# Altium PCB PCB2_1.pcbdoc
Units mil, origin at the board's own origin, x right, y up, seen from the top; angles counter-clockwise.
Board outline 5854.02 x 5837.28 mil, 2 copper layers (Top Layer, Bottom Layer); 43 components, 34 nets, 145 pads, 54 vias.
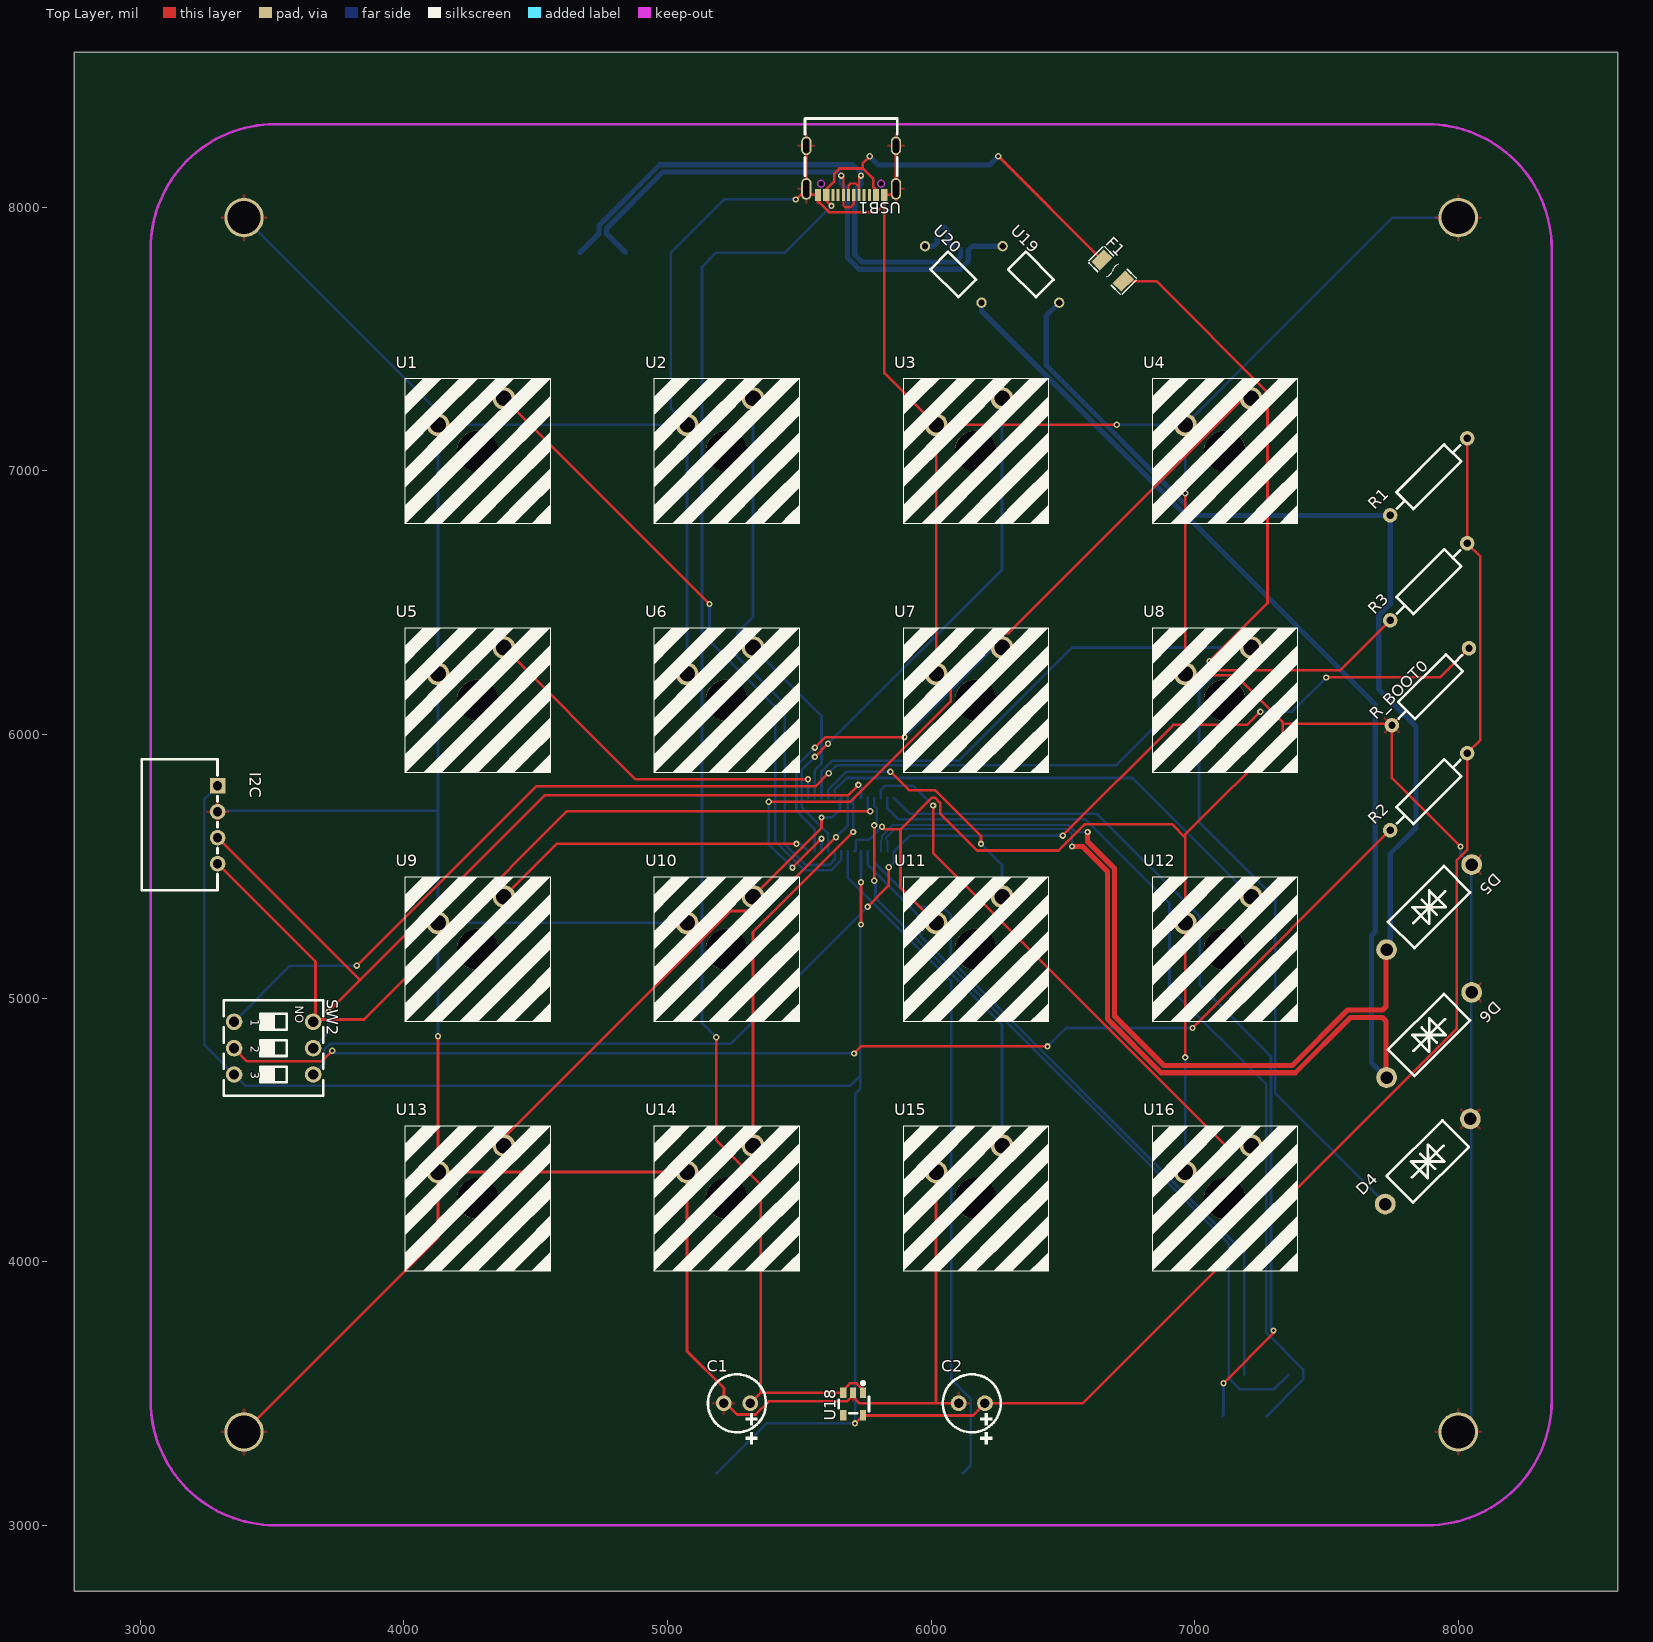
[diagram p0: Top Layer view]
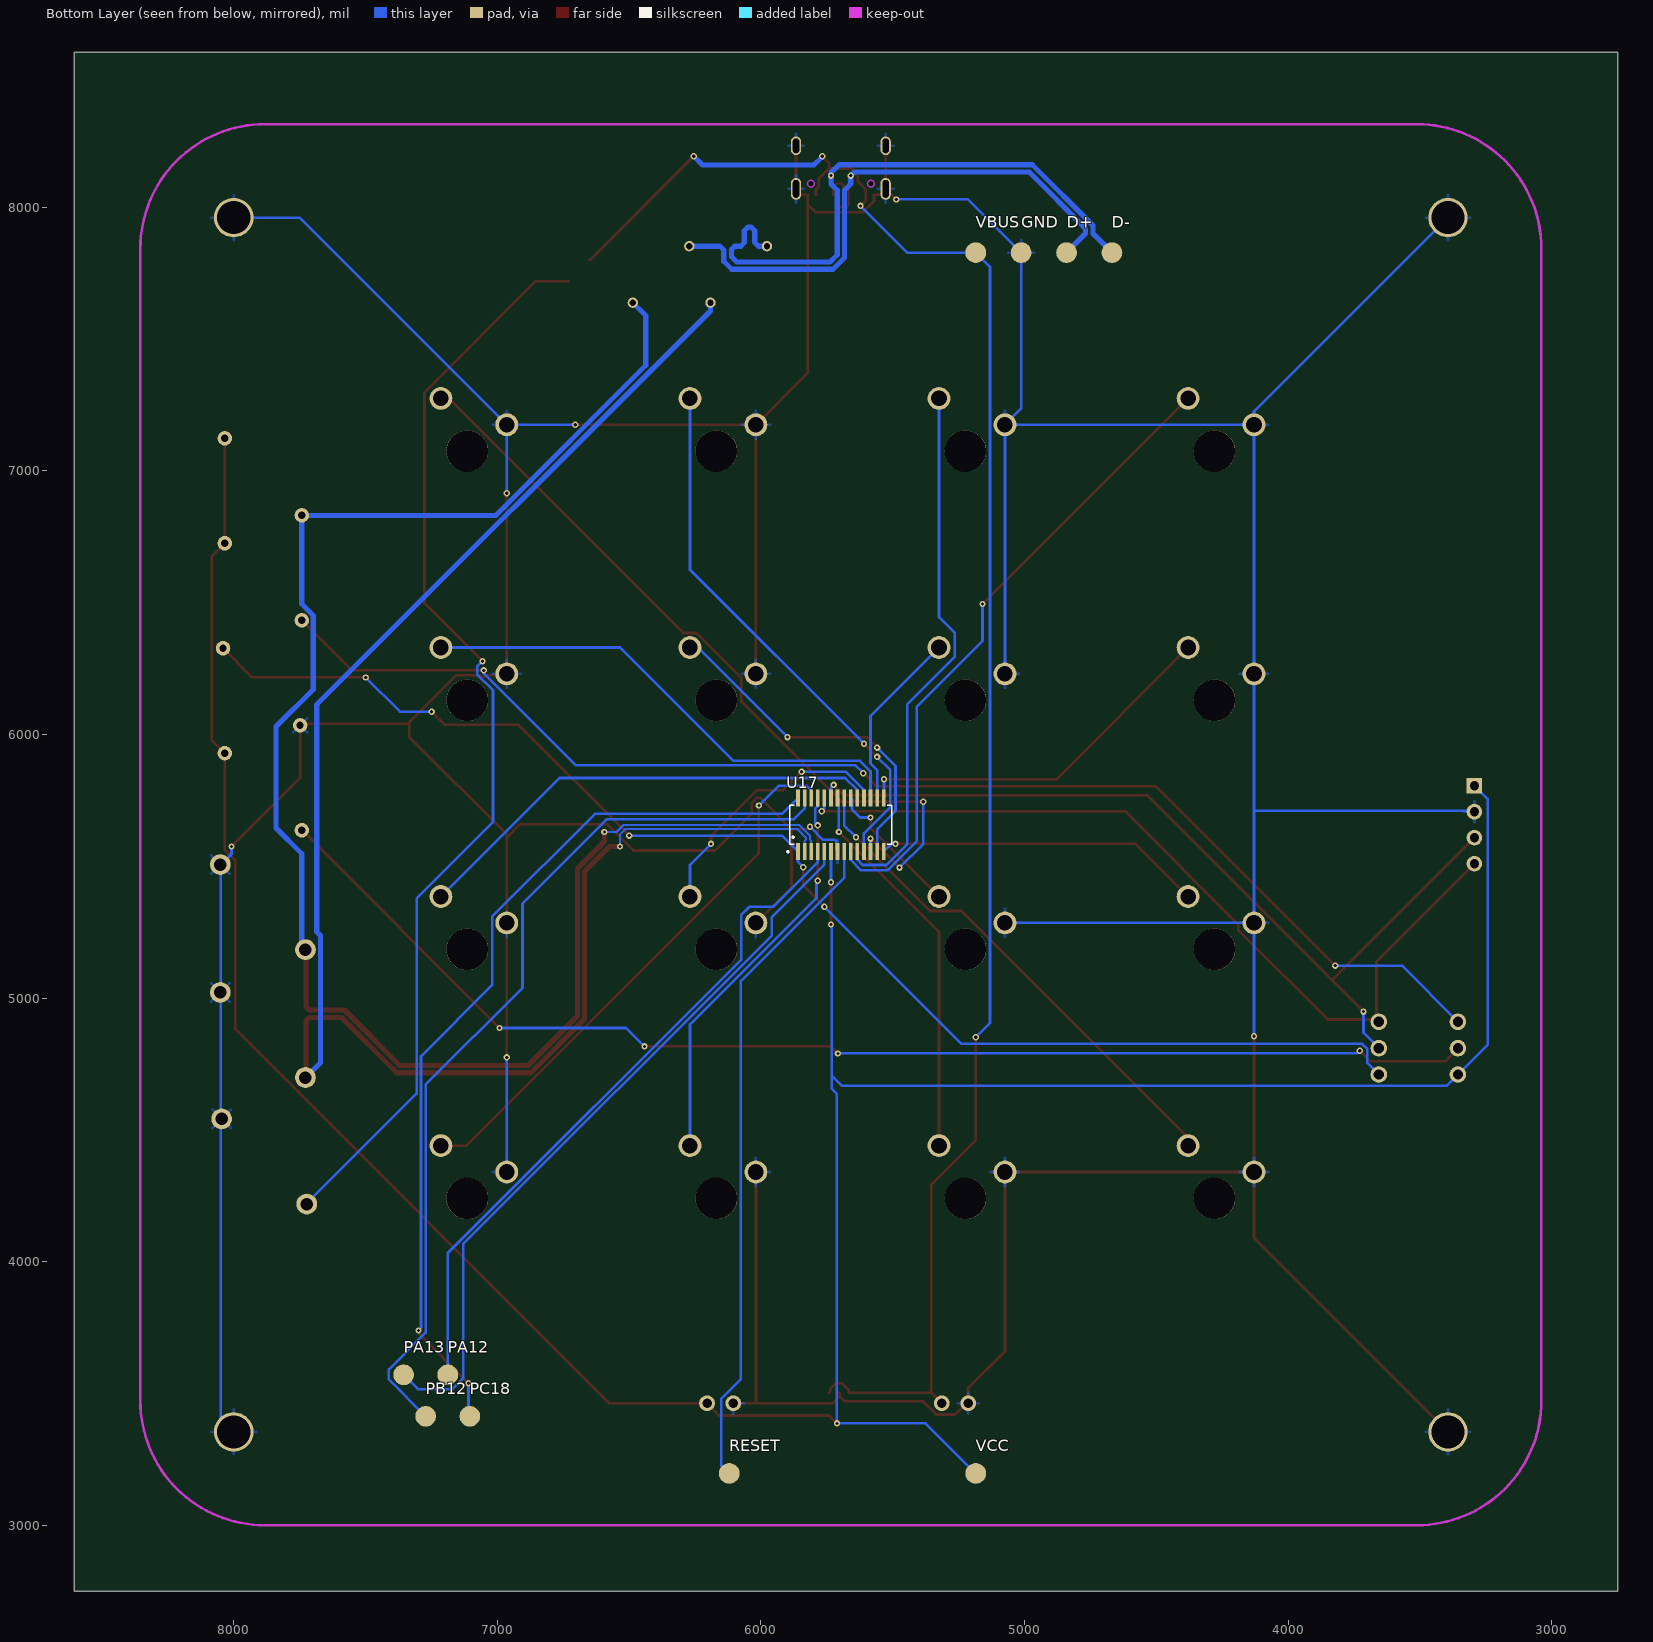
[diagram p1: Bottom Layer view, seen from below]

## Layer stack, top to bottom
Top Layer: signal copper (thickness not stored)
Dielectric: dielectric 12.6, FR-4, Dk 4.8
Bottom Layer: signal copper (thickness not stored)

## Board outline
8604.02,2750 2750,2750 2750,8587.28 8604.02,8587.28

## Design rules (kind name [scope] priority, off if disabled: settings)
BoardOutlineClearance copperThickness1oz [All] p0: genericclearance=10 ignorepadtopadclearanceinfootprint=FALSE except(0: Arc-SplitContinuation Track-SplitContinuation SMDPad-SplitContinuation THPad-SplitContinuation Via-SplitContinuation Fill-SplitContinuation Poly-SplitContinuation Region-SplitContinuation Text-SplitContinuation; 6: Track-CutoutEdge SMDPad-CutoutEdge THPad-CutoutEdge Via-CutoutEdge Region-CutoutEdge; 11.8: Track-OutlineEdge SMDPad-OutlineEdge THPad-OutlineEdge Via-OutlineEdge Fill-OutlineEdge Region-OutlineEdge Poly-OutlineEdge Text-OutlineEdge Fill-CutoutEdge)
BoardOutlineClearance copperThickness2oz [All] p0: genericclearance=10 ignorepadtopadclearanceinfootprint=FALSE except(0: Arc-SplitContinuation Track-SplitContinuation SMDPad-SplitContinuation THPad-SplitContinuation Via-SplitContinuation Fill-SplitContinuation Poly-SplitContinuation Region-SplitContinuation Text-SplitContinuation; 6: Track-CutoutEdge SMDPad-CutoutEdge THPad-CutoutEdge Via-CutoutEdge Region-CutoutEdge; 11.8: Track-OutlineEdge SMDPad-OutlineEdge THPad-OutlineEdge Via-OutlineEdge Fill-OutlineEdge Region-OutlineEdge Poly-OutlineEdge Text-OutlineEdge Fill-CutoutEdge)
Clearance copperThickness1oz [(InNet('USB_D-') OR InNet('GND') OR InNet('VCC') OR InNet('SDA') OR InNet('SCL') OR InNet('B') OR InNet('C') OR InNet('D') OR InNet('E') OR InNet('F') OR InNet('G') OR InNet('H') OR InNet('I') OR InNet('J') OR InNet('K') OR InNet('L') OR InNet('M') OR InNet('N') OR InNet('O') OR InNet('P') OR InNet('A') OR InNet('PA12') OR InNet('PA13') OR InNet('PB12') OR InNet('RESET') OR InNet('USB_D+') OR InNet('VBUS') OR InNet('$1N1970') OR InNet('PC18') OR InNet('BOOT0') OR InNet('MCU_D+') OR InNet('MCU_D-') OR InNet('$1N9766') OR InNet('$1N9709'))] p1: gap=7 ignorepadtopadclearanceinfootprint=FALSE except(4: Track-Track; 6: Track-SMDPad SMDPad-SMDPad Track-THPad SMDPad-THPad THPad-THPad Track-Via SMDPad-Via THPad-Via Via-Via SMDPad-Fill THPad-Fill Via-Fill Fill-Fill Track-Region SMDPad-Region THPad-Region Via-Region Region-Region Track-Poly SMDPad-Poly THPad-Poly Via-Poly Fill-Poly Region-Poly Poly-Poly Track-Text SMDPad-Text THPad-Text Via-Text Fill-Text Region-Text Poly-Text Text-Text; 6.9: Track-Hole SMDPad-Hole THPad-Hole Via-Hole Fill-Hole Region-Hole Poly-Hole Text-Hole Sheet-Hole; 11.8: Track-Fill Fill-Region Track-Sheet SMDPad-Sheet THPad-Sheet Via-Sheet Fill-Sheet Region-Sheet Poly-Sheet Text-Sheet)
Clearance copperThickness2oz [All] p1: gap=7 ignorepadtopadclearanceinfootprint=FALSE except(6: Track-SMDPad SMDPad-SMDPad Track-THPad SMDPad-THPad THPad-THPad Track-Via SMDPad-Via THPad-Via Via-Via SMDPad-Fill THPad-Fill Via-Fill Fill-Fill Track-Region SMDPad-Region THPad-Region Via-Region Region-Region Track-Poly SMDPad-Poly THPad-Poly Via-Poly Fill-Poly Region-Poly Poly-Poly Track-Text SMDPad-Text THPad-Text Via-Text Fill-Text Region-Text Poly-Text Text-Text; 6.9: Track-Hole SMDPad-Hole THPad-Hole Via-Hole Fill-Hole Region-Hole Poly-Hole Text-Hole Sheet-Hole; 8: Track-Track; 11.8: Track-Fill Fill-Region Track-Sheet SMDPad-Sheet THPad-Sheet Via-Sheet Fill-Sheet Region-Sheet Poly-Sheet Text-Sheet)
DiffPairsRouting differentialPair [All] p1: maxuncoupledlength=196.8504 minlimit=7.874 maxlimit=7.874 mostfreqgap=7.874 toplayer_minwidth=7.874 toplayer_prefwidth=19.685 toplayer_maxwidth=27.5591 bottomlayer_minwidth=7.874 bottomlayer_prefwidth=19.685 bottomlayer_maxwidth=27.5591
PasteMaskExpansion pasteMaskExpansion [All] p1: expansion=0
PlaneConnect innerPlane [All] p1: planeconnectstyle=Relief reliefexpansion=20 reliefentries=4 reliefconductorwidth=10 reliefairgap=10
PolygonConnect copperRegion [All] p1: connectstyle=Relief reliefentries=4 reliefconductorwidth=10 polygonreliefangle="90 Angle" airgapwidth=10
RoutingVias viaSize [All] p1: viastyle="Through Hole" holewidth=12.0078 minholewidth=11.811 maxholewidth=248.0314 width=24.0158 minwidth=19.685 maxwidth=393.7008
SolderMaskExpansion solderMaskExpansion [All] p1: useseparateexpansions=TRUE expansion=2 expansionbottom=2
Width copperThickness1oz [All] p1: maxlimit=100 minlimit=5 preferedwidth=10
Width copperThickness2oz [All] p1: maxlimit=100 minlimit=8 preferedwidth=10

## Components (designator, comment, footprint, x,y, rotation, side; value= is the part's Value field where it differs from the comment)
C1 "199D106X0025C1V1E3" CAP-TH_BD5.5-P2.54-D0.5-FD 5263.46,3462.6 r0 top
C2 "199D106X0025C1V1E3" CAP-TH_BD5.5-P2.54-D0.5-FD 6154.21,3462.6 r0 top
D4 "SA5.0CA_C5310909" DO-15_BD3.1-L6.7-P10.70-D0.9-BI 7884.06,4379.96 r45 top
D5 "SA5.0CA_C5310909" DO-15_BD3.1-L6.7-P10.70-D0.9-BI 7889.06,5344.96 r225 top
D6 "SA5.0CA_C5310909" DO-15_BD3.1-L6.7-P10.70-D0.9-BI 7889.06,4859.96 r225 top
D+ "Test-Point" Test-Point-0.5mm 4840.36,7827.68 r180 bottom
D- "Test-Point" Test-Point-0.5mm 4668.11,7827.68 r180 bottom
F1 "500mA/24V" F1206 6688.18,7759.96 r315 top
GND "Test-Point" Test-Point-0.5mm 5012.6,7827.68 r180 bottom
I2C "ZX-XH2.54-4PWZ" CONN-TH_4P-P2.50_ZX-XH2.54-4PWZ 3292.99,5657.48 r270 top
PA12 "Test-Point" Test-Point-0.5mm 7187.8,3570.79 r180 bottom
PA13 "Test-Point" Test-Point-0.5mm 7355.12,3570.79 r180 bottom
PB12 "Test-Point" Test-Point-0.5mm 7271.46,3413.31 r180 bottom
PC18 "Test-Point" Test-Point-0.5mm 7104.14,3413.31 r180 bottom
R1 "MF1/4W-1.5KΩ±1% T" RES-TH_BD2.3-L6.5-P10.50-D0.5 7887.48,6977.24 r45 top
R2 "MF1/4W-4.7KΩ±1% T" RES-TH_BD2.3-L6.5-P10.50-D0.5 7887.48,5782.74 r45 top
R3 "MF1/4W-4.7KΩ±1% T" RES-TH_BD2.3-L6.5-P10.50-D0.5 7887.48,6579.07 r45 top
R_BOOT0 "MF1/4W-10KΩ±1% T" RES-TH_BD2.3-L6.5-P10.50-D0.5 7894.06,6180.9 r45 top
RESET "Test-Point" Test-Point-0.5mm 6119.88,3196.77 r180 bottom
SW2 "DSWB03LHGET" SW-TH_DSWB03LHGET 3505.59,4809.96 r270 top
U1 "CherryMX" CherryMX_9.75u 4279.21,7074.79 r0 top
U2 "CherryMX" CherryMX_9.75u 5224.09,7074.79 r0 top
U3 "CherryMX" CherryMX_9.75u 6168.98,7074.79 r0 top
U4 "CherryMX" CherryMX_9.75u 7113.86,7074.79 r0 top
U5 "CherryMX" CherryMX_9.75u 4279.21,6129.9 r0 top
U6 "CherryMX" CherryMX_9.75u 5224.09,6129.9 r0 top
U7 "CherryMX" CherryMX_9.75u 6168.98,6129.9 r0 top
U8 "CherryMX" CherryMX_9.75u 7113.86,6129.9 r0 top
U9 "CherryMX" CherryMX_9.75u 4279.21,5185.02 r0 top
U10 "CherryMX" CherryMX_9.75u 5224.09,5185.02 r0 top
U11 "CherryMX" CherryMX_9.75u 6168.98,5185.02 r0 top
U12 "CherryMX" CherryMX_9.75u 7113.86,5185.02 r0 top
U13 "CherryMX" CherryMX_9.75u 4279.21,4240.14 r0 top
U14 "CherryMX" CherryMX_9.75u 5224.09,4240.14 r0 top
U15 "CherryMX" CherryMX_9.75u 6168.98,4240.14 r0 top
U16 "CherryMX" CherryMX_9.75u 7113.86,4240.14 r0 top
U17 "CH32X035G8R6_C49118551" QSOP-28_L9.9-W3.9-P0.64-LS6.0-BL 5696.54,5657.48 r180 bottom
U18 "AP2112K-3.3TRG1_C23380830" SOT-23-5_L2.9-W1.6-P0.95-LS2.8-BR 5704.06,3459.96 r90 top
U19 "CR1/8W-22Ω±5%-ST52" RES-TH_BD2.3-L3.7-P7.70-D0.4 6378.49,7744.96 r315 top
U20 "CR1/8W-22Ω±5%-ST52" RES-TH_BD2.3-L3.7-P7.70-D0.4 6084.02,7744.96 r315 top
USB1 "TYPE-C16PIN" USB-C-SMD_TYPE-C16PIN 5696.54,8139.96 r180 top
VBUS "Test-Point" Test-Point-0.5mm 5184.72,7827.76 r180 bottom
VCC "Test-Point" Test-Point-0.5mm 5184.84,3196.77 r180 bottom

## Footprints (in the part's own frame and the unit in brackets; to place one, negate y for a bottom-side part, rotate by r counter-clockwise, add the part's x,y. Pads: shape width x height; smd on the part's side, far side on the other; paste and mask are expansions set on the pad)
CAP-TH_BD5.5-P2.54-D0.5-FD [mil]
  round 60 hole 36: 1(-50,0) 2(50,0)
  silkscreen extent -110,-155 110,110
CherryMX_9.75u [mm]
  round 2.2 hole 1.5: 1(-3.81,2.54) 2(2.54,5.08)
  round 4 hole 4 unplated: ""(0,0)
  silkscreen extent -7,-7 7,7
CONN-TH_4P-P2.50_ZX-XH2.54-4PWZ [mm]
  rect 1.524x1.5 hole 0.9: 1(-3.75,0)
  round 1.5 hole 0.9: 2(-1.25,0) 3(1.25,0) 4(3.75,0)
  silkscreen extent -6.3,-7.32 6.3,0
DO-15_BD3.1-L6.7-P10.70-D0.9-BI [mm]
  round 2 hole 1.2: 1(-5.8,0) 2(5.8,0)
  silkscreen extent -3.8,-1.8 3.8,1.8
F1206 [mm]
  rect 1.19x1.728 smd: 1(-1.445,0) 2(1.445,0)
  silkscreen extent -2.27,-1.09 2.27,1.09
QSOP-28_L9.9-W3.9-P0.64-LS6.0-BL [mil]
  rect 14x64.57 smd: 1(-162.5,-101.18) 2(-137.5,-101.18) 3(-112.5,-101.18) 4(-87.5,-101.18) 5(-62.5,-101.18) 6(-37.5,-101.18) 7(-12.5,-101.18) 8(12.5,-101.18) 9(37.5,-101.18) 10(62.5,-101.18) 11(87.5,-101.18) 12(112.5,-101.18) 13(137.5,-101.18) 14(162.5,-101.18) 15(162.5,101.18) 16(137.5,101.18) 17(112.5,101.18) 18(87.5,101.18) 19(62.5,101.18) 20(37.5,101.18) 21(12.5,101.18) 22(-12.5,101.18) 23(-37.5,101.18) 24(-62.5,101.18) 25(-87.5,101.18) 26(-112.5,101.18) 27(-137.5,101.18) 28(-162.5,101.18)
  silkscreen extent -204,-106 193,75
RES-TH_BD2.3-L3.7-P7.70-D0.4 [mm]
  round 1 hole 0.6: 1(-3.85,0) 2(3.85,0)
  silkscreen extent -1.9,-1.2 1.9,1.2
RES-TH_BD2.3-L6.5-P10.50-D0.5 [mm]
  round 1.4 hole 0.7: 1(-5.25,0) 2(5.25,0)
  silkscreen extent -4.32,-1.15 4.32,1.15
SOT-23-5_L2.9-W1.6-P0.95-LS2.8-BR [mm]
  rect 1x0.6 smd: 1(1.1,-0.95) 2(1.1,0) 3(1.1,0.95) 4(-1.1,0.95) 5(-1.1,-0.95)
  silkscreen extent -0.89,-1.52 2.16,1.4
SW-TH_DSWB03LHGET [mm]
  round 1.6 hole 1: 1(-2.54,3.81) 2(0,3.81) 3(2.54,3.81) 4(-2.54,-3.81) 5(0,-3.81) 6(2.54,-3.81)
  silkscreen extent -4.6,-4.8 4.6,4.8
Test-Point-0.5mm [mm]
  round 2 smd: 1(0,0)
USB-C-SMD_TYPE-C16PIN [mm]
  oval 1x2.1 hole 0.6 slot 1.7 at 90 deg: 1(-4.32,1.787) 2(4.32,1.787)
  oval 1x1.8 hole 0.6 slot 1.4 at 90 deg: 3(-4.32,-2.362) 4(4.32,-2.362)
  rect 0.6x1.15 smd: A1B12(-3.2,2.362) A4B9(-2.4,2.362) B1A12(3.2,2.362) B4A9(2.4,2.362)
  rect 0.3x1.15 smd: A5(-1.25,2.362) A6(-0.25,2.362) A7(0.25,2.362) A8(1.25,2.362) B5(1.75,2.362) B6(0.75,2.362) B7(-0.75,2.362) B8(-1.75,2.362)
  Board Outline Layer circle w0.005: c2.89,1.288 r0.325
  Board Outline Layer circle w0.005: c-2.89,1.288 r0.325
  Board Outline Layer region: 2.565,1.288 2.597,1.429 2.687,1.542 2.818,1.605 2.962,1.605 3.093,1.542 3.183,1.429 3.215,1.288 3.215,1.288 3.183,1.147 3.093,1.034 2.962,0.971 2.818,0.971 2.687,1.034 2.597,1.147 2.565,1.288
  Board Outline Layer region: -3.215,1.288 -3.183,1.429 -3.093,1.542 -2.962,1.605 -2.818,1.605 -2.687,1.542 -2.597,1.429 -2.565,1.288 -2.565,1.288 -2.597,1.147 -2.687,1.034 -2.818,0.971 -2.962,0.971 -3.093,1.034 -3.183,1.147 -3.215,1.288
  Multi-Layer board cut-out: 2.565,1.288 2.597,1.429 2.687,1.542 2.818,1.605 2.962,1.605 3.093,1.542 3.183,1.429 3.215,1.288 3.215,1.288 3.183,1.147 3.093,1.034 2.962,0.971 2.818,0.971 2.687,1.034 2.597,1.147 2.565,1.288
  Multi-Layer board cut-out: -3.215,1.288 -3.183,1.429 -3.093,1.542 -2.962,1.605 -2.818,1.605 -2.687,1.542 -2.597,1.429 -2.565,1.288 -2.565,1.288 -2.597,1.147 -2.687,1.034 -2.818,0.971 -2.962,0.971 -3.093,1.034 -3.183,1.147 -3.215,1.288
  silkscreen extent -4.45,-5 4.45,0.52

## Free pads (board coordinates)
  round 149.61 hole 125.98: 1(3393.39,3354.33) 1(3393.39,7960.63) 1(7999.68,3354.33) 1(7999.68,7960.63)

## Via types
v1: diameter 24.02, hole 12.01, Top Layer to Bottom Layer, 54 vias

## Nets (pads, with @x,y where several pads share a name; then routed paths per layer and width w, separated by ;. In a path a pad name is that pad's centre, name@x,y a point inside that pad or via, vN(x,y) a via of type N, cw(c..) or ccw(c..) an arc to the next point about the centre after c; other vN are vias at no path point)
$1N1970: D4.1 F1.2 | length 4220.7
  Top Layer w10: F1.2 6854.24,7719.73 7276.01,7297.96 7276.01,6497.96 v1(7056.01,6277.96)
  Bottom Layer w10: v1(7056.01,6277.96) 7076.01,6257.96 7076.01,6227.96 7016.01,6167.96 7016.01,5667.96 7306.01,5377.96 7306.01,4637.96 D4.1@7726.01,4217.96
$1N9709: R3.1 SW2.4 | length 5022.4
  Top Layer w10: v1(3821.33,5122.92) 4501.33,5802.92 5561.33,5802.92 v1(5611.33,5852.92) ; v1(7051.33,6242.92) 7551.33,6242.92 R3.1
  Bottom Layer w10: SW2.4 3568.55,5122.92 v1(3821.33,5122.92) ; v1(5611.33,5852.92) 5641.33,5882.92 6701.33,5882.92 7051.33,6232.92 v1(7051.33,6242.92)
$1N9766: R2.1 SW2.5 | length 4777.8
  Top Layer w10: SW2.5 3405.59,4759.96 3687.95,4759.96 v1(3727.95,4799.96) ; v1(5707.95,4789.96) 5734.58,4816.59 v1(6441.33,4816.59) ; v1(6991.33,4886.59) R2.1
  Bottom Layer w10: v1(3727.95,4799.96) 3737.95,4789.96 v1(5707.95,4789.96) ; v1(6441.33,4816.59) 6511.33,4886.59 v1(6991.33,4886.59)
A: U1.2 U17.9 | length 2450.3
  Top Layer w10: U1.2 v1(5159.21,6494.79)
  Bottom Layer w10: v1(5159.21,6494.79) 5159.21,6354.79 5409.21,6104.79 5409.21,5594.79 5519.21,5484.79 5619.21,5484.79 5659.21,5524.79 U17.9
B: U2.2 U17.10 | length 2052.3
  Bottom Layer w10: U2.2 5324.09,6444.79 5264.09,6384.79 5264.09,6294.79 5444.09,6114.79 5444.09,5584.79 5524.09,5504.79 5614.09,5504.79 5634.09,5524.79 U17.10
BOOT0: R_BOOT0.2 SW2.3 U17.1 | length 5149.9
  Top Layer w10: v1(5759.04,5346.3) 5839.04,5426.3 v1(5839.04,5496.3) ; v1(6499.04,5616.3) 6919.04,6036.3 7199.04,6036.3 v1(7249.04,6086.3) ; v1(7499.04,6216.3) 7929.45,6216.3 R_BOOT0.2
  Bottom Layer w10: SW2.3 3699.04,4753.41 3699.04,4806.3 3719.04,4826.3 5239.04,4826.3 v1(5759.04,5346.3) ; v1(5839.04,5496.3) 5859.04,5516.3 U17.1 5919.04,5616.3 v1(6499.04,5616.3) ; v1(7249.04,6086.3) 7369.04,6086.3 v1(7499.04,6216.3)
C: U3.2 U17.11 | length 2074.7
  Top Layer w10: v1(5558.98,5914.79) v1(5608.98,5964.79)
  Bottom Layer w10: v1(5558.98,5914.79) 5508.98,5864.79 5508.98,5724.79 5609.04,5624.73 U17.11 ; v1(5608.98,5964.79) 6268.98,6624.79 U3.2
D: U4.2 U17.12 | length 3007.6
  Top Layer w10: v1(5383.86,5744.79) 5693.86,5744.79 6073.86,6124.79 6073.86,6214.79 6243.86,6384.79 6293.86,6384.79 7183.86,7274.79 U4.2 ; v1(5473.86,5494.79) v1(5583.86,5604.79)
  Bottom Layer w10: v1(5383.86,5744.79) 5383.86,5584.79 v1(5473.86,5494.79) ; U17.12@5583.86,5556.48 v1(5583.86,5604.79)
E: U5.2 U17.15 | length 1432.4
  Top Layer w10: U5.2 4879.21,5829.9 v1(5532.79,5829.9)
  Bottom Layer w10: v1(5532.79,5829.9) 5532.79,5759.9 U17.15
F: U6.2 U17.16 | length 689.3
  Bottom Layer w10: U6.2 5584.09,6069.9 5584.09,5889.9 5559.04,5864.84 U17.16
G: U7.2 U17.13 | length 1319
  Top Layer w10: v1(5558.98,5949.9) 5598.98,5989.9 v1(5898.98,5989.9)
  Bottom Layer w10: v1(5558.98,5949.9) 5488.98,5879.9 5488.98,5709.9 5559.04,5639.84 U17.13 ; v1(5898.98,5989.9) 6238.98,6329.9 U7.2
GND: C1.1 C2.1 D4.2 D5.1 D6.1 GND.1 I2C.2 pad.1 R_BOOT0.1 U1.1 U2.1 U3.1 U4.1 U5.1 U6.1 U7.1 U8.1 U9.1 U10.1 U11.1 U12.1 U13.1 U14.1 U15.1 U16.1 U17.7 U18.2 USB1.1 USB1.2 USB1.3 USB1.4 USB1.A1B12 USB1.B1A12 | length 27289.6
  Top Layer w10: pad.1@3393.39,3354.33 4129.21,4090.16 U13.1 ; v1(4129.21,4855.02) U13.1 ; C1.1 C1.1@5214.09,3470.14 ; v1(5486.46,8029.59) USB1.2 ; USB1.4 USB1.2 ; U18.2 5700.93,3500.14 U18.2@5700.93,3490.14 ; v1(5813.86,5649.9) 5823.86,5639.9 5883.86,5639.9 ; USB1.3 USB1.1 5843.98,8046.95 USB1.A1B12 5822.53,8011.24 ; U15.1 6018.47,4339.64 6018.47,3462.6 ; U11.1 5883.86,5420.14 5883.86,5639.9 ; U7.1 U3.1 ; C2.1 6018.47,3462.6 ; v1(6703.86,7174.79) U3.1 ; v1(6963.86,4775.02) U12.1 6963.86,5609.9 ; v1(6963.86,6914.79) U8.1 6968.86,6229.9 6973.86,6224.9 7036.83,6224.9 7041.8,6219.93 7060.85,6219.93 7065.83,6224.9 7153.86,6224.9 7333.86,6044.9 7333.86,6039.9 ; v1(8007.9,5574.75) 7747.9,5834.75 R_BOOT0.1 7742.75,6039.9 7333.86,6039.9 ; U13.1 U14.1 5074.09,3660.14 5214.09,3520.14 C1.1@5214.09,3470.14 ; C1.1@5214.09,3470.14 5264.09,3420.14 5334.09,3420.14 5384.09,3470.14 5680.93,3470.14 U18.2@5700.93,3490.14 ; USB1.2 5549.1,8046.95 USB1.B1A12 5570.56,8023.21 5612.53,7981.24 5792.53,7981.24 5822.53,8011.24 ; U18.2@5700.93,3490.14 5728.47,3462.6 6018.47,3462.6 ; 5822.53,8011.24 5822.53,7371.24 U3.1 ; 5883.86,5639.9 6003.86,5759.9 6013.86,5759.9 6033.86,5739.9 6033.86,5699.9 6173.86,5559.9 6483.86,5559.9 6583.86,5659.9 6913.86,5659.9 6963.86,5609.9 ; 6963.86,5609.9 6963.86,5619.9 7333.86,5989.9 7333.86,6039.9
  Bottom Layer w10: I2C.2 3296.2,5709.9 4129.21,5709.9 ; pad.1@3393.39,7960.63 4129.21,7224.8 U1.1 ; v1(4129.21,4855.02) U9.1 ; U10.1 U9.1 ; U6.1 U2.1 ; v1(5486.46,8029.59) 5214.51,8029.59 GND.1 5012.6,7236.28 U2.1 ; U17.7 5713.86,5561.12 5713.86,5594.13 5719.63,5599.9 5763.86,5599.9 v1(5813.86,5649.9) ; v1(6703.86,7174.79) U4.1 ; U16.1 v1(6963.86,4775.02) ; v1(6963.86,6914.79) U4.1 ; pad.1@7999.68,3354.33 8048.95,3403.59 8048.95,5504.28 8007.9,5545.32 v1(8007.9,5574.75) ; pad.1@7999.68,7960.63 7749.7,7960.63 U4.1 ; U9.1 4129.21,5709.9 ; 4129.21,5709.9 U5.1 U1.1 ; U1.1 U2.1
H: U8.2 U17.17 | length 1925.7
  Bottom Layer w10: U17.17@5583.86,5758.84 5583.86,5859.9 5623.86,5899.9 6103.86,5899.9 6533.86,6329.9 U8.2
I: U9.2 U17.14 | length 1249.6
  Top Layer w10: U9.2 4579.21,5585.02 v1(5489.21,5585.02)
  Bottom Layer w10: v1(5489.21,5585.02) 5505.31,5585.02 U17.14
J: U10.2 U17.20 | length 535.8
  Top Layer w10: U10.2 5584.09,5645.02 v1(5584.09,5685.02)
  Bottom Layer w10: v1(5584.09,5685.02) 5624.09,5685.02 5654.09,5715.02 5654.09,5753.72 U17.20
K: U11.2 U17.18 | length 1003
  Top Layer w10: v1(5845.34,5858.66) 5915.34,5788.66 6015.34,5788.66 6188.98,5615.02 v1(6188.98,5585.02)
  Bottom Layer w10: U17.18 5609.04,5788.66 5679.04,5858.66 v1(5845.34,5858.66) ; v1(6188.98,5585.02) 6268.98,5505.02 U11.2
L: U12.2 U17.19 | length 1815.4
  Bottom Layer w10: U17.19 5634.04,5788.66 5680.4,5835.02 6763.86,5835.02 U12.2
M: U13.2 U17.21 | length 1929.3
  Top Layer w10: U13.2 4379.21,4470.14 5239.21,5330.14 5359.21,5330.14 v1(5639.21,5610.14)
  Bottom Layer w10: v1(5639.21,5610.14) 5684.04,5654.96 U17.21
MCU_D+: D5.2 R1.1 U17.3 U19.2 | length 6594.1
  Top Layer w19.68: v1(6593.54,5629.96) 6593.54,5594.45 6696.04,5491.95 6696.04,4931.95 6883.54,4744.45 7369.57,4744.45 7579.4,4954.27 7712.09,4954.27 7726.01,4968.19 D5.2@7726.01,5181.34
  Bottom Layer w7.87: U17.3 5809.04,5596.46 5813.66,5601.08 5813.66,5615.48 5854.48,5656.3 6521.09,5656.3 6547.43,5629.96 v1(6593.54,5629.96)
  Bottom Layer w19.68: U19.2 6436.59,7588.7 6436.59,7492.12 6436.59,7400.27 7005.77,6831.09 R1.1 7741.33,6494.28 7697.94,6450.89 7697.94,6171.07 7839.06,6029.96 7839.06,5644.96 7741.33,5547.23 7741.33,5196.66 D5.2@7726.01,5181.34
MCU_D-: D6.2 U17.2 U20.2 | length 6593
  Top Layer w19.68: v1(6534.06,5574.96) 6574.06,5574.96 6668.48,5480.53 6668.48,4920.53 6872.13,4716.89 7380.98,4716.89 7590.81,4926.72 7712.09,4926.72 7726.01,4912.8 D6.2@7726.01,4699.65
  Bottom Layer w7.87: U17.2 5834.04,5596.46 5829.41,5601.08 5829.41,5608.96 5861.01,5640.56 6514.57,5640.56 6534.06,5621.07 v1(6534.06,5574.96)
  Bottom Layer w19.68: U20.2 6191.2,7606.68 7684.53,6113.35 7684.53,5250.44 7670.82,5236.72 7670.82,4754.85 D6.2@7726.01,4699.65
N: U14.2 U17.22 | length 1478
  Top Layer w10: U14.2 5324.09,5250.14 v1(5704.09,5630.14)
  Bottom Layer w10: v1(5704.09,5630.14) 5704.09,5753.72 U17.22
O: U15.2 U17.25 | length 1527.7
  Top Layer w10: v1(5784.04,5445.08) v1(5784.04,5655.08)
  Bottom Layer w10: v1(5784.04,5445.08) 5788.98,5440.14 5788.98,5380.14 6268.98,4900.14 U15.2 ; v1(5784.04,5655.08) 5794.04,5665.08 5794.04,5718.66 5784.04,5728.66 U17.25
P: U16.2 U17.26 | length 2113
  Top Layer w10: v1(6007.56,5730.14) 6007.56,5550.14 7117.56,4440.14 U16.2
  Bottom Layer w10: U17.26 5809.04,5788.66 5826.08,5805.7 5931.99,5805.7 v1(6007.56,5730.14)
PA12: PA12.1 U17.4 | length 2619.7
  Bottom Layer w10: U17.4 5784.04,5516.3 5954.04,5346.3 6044.04,5346.3 6074.04,5316.3 6074.04,5146.3 7187.8,4032.54 PA12.1
PA13: PA13.1 U17.5 | length 2832.7
  Bottom Layer w10: U17.5 5759.04,5506.3 5959.04,5306.3 5959.04,5236.3 7129.04,4066.3 7129.04,3556.3 7169.04,3516.3 7300.63,3516.3 PA13.1
PB12: PB12.1 U17.27 | length 3472.6
  Bottom Layer w10: U17.27 5834.04,5718.66 5874.04,5678.66 6584.04,5678.66 6904.04,5358.66 6904.04,5038.66 7271.46,4671.24 7271.46,3731.24 7411.46,3591.24 7411.46,3553.31 PB12.1
PC18: PC18.1 U17.28 | length 3438.5
  Top Layer w10: v1(7109.04,3538.66) 7299.04,3728.66 v1(7299.04,3738.66)
  Bottom Layer w10: U17.28 5919.04,5698.66 6629.04,5698.66 7019.04,5308.66 7019.04,5048.66 7289.04,4778.66 7289.04,3748.66 v1(7299.04,3738.66) ; PC18.1 7109.04,3418.21 v1(7109.04,3538.66)
RESET: RESET.1 U17.8 | length 2564.9
  Bottom Layer w10: U17.8 5684.04,5456.3 6075.87,5064.47 6075.87,3554.47 6149.88,3480.45 6149.88,3226.77 RESET.1
SCL: I2C.4 SW2.1 U17.24 | length 3255.1
  Top Layer w10: I2C.4 3664.29,5138.54 SW2.1@3664.29,4918.66 ; SW2.1 SW2.1@3664.29,4918.66 ; v1(5769.04,5708.66) 4619.04,5708.66 4189.04,5278.66 4189.04,5258.66 3849.04,4918.66 SW2.1@3664.29,4918.66
  Bottom Layer w10: U17.24 5759.04,5718.66 v1(5769.04,5708.66)
SDA: I2C.3 SW2.2 U17.23 | length 3347.8
  Top Layer w10: I2C.3 3832.6,5068.66 3834.04,5068.66 ; v1(3714.04,4948.66) 3834.04,5068.66 ; v1(5724.04,5808.66) 5684.04,5768.66 4534.04,5768.66 3834.04,5068.66
  Bottom Layer w10: SW2.2 3714.04,4868.41 v1(3714.04,4948.66) ; v1(5724.04,5808.66) 5734.04,5798.66 U17.23
USB_D+: D+.1 U19.1 USB1.A6 USB1.B6 | length 2295.1
  Top Layer w7.87: v1(5659.06,8119.96) 5667.01,8112.01 USB1.B6 5667.01,8007.01 5674.06,7999.96 5694.06,7999.96 5706.38,8012.28 USB1.A6
  Bottom Layer w19.68: D+.1 4768.01,7900.02 4768.01,7919.71 4982.19,8133.88 5645.14,8133.88 v1(5659.06,8119.96) 5659.06,8088.27 5682.78,8064.55 5682.78,7808.55 5726.36,7764.96 6014.06,7764.96 6110.47,7764.96 6140.53,7795.02 6140.53,7838.22 6154.45,7852.14 U19.1
USB_D-: D-.1 U20.1 USB1.A7 USB1.B7 | length 2416.1
  Top Layer w7.87: USB1.A7 5686.7,8082.6 5694.06,8089.96 5714.06,8089.96 5726.07,8077.95 ; USB1.B7 5726.07,8077.95 ; v1(5734.06,8119.96) 5726.07,8111.97 5726.07,8077.95
  Bottom Layer w19.68: D-.1 4740.45,7900.02 4740.45,7931.12 4970.77,8161.44 5703.99,8161.44 5734.06,8131.38 v1(5734.06,8119.96) 5734.06,8088.27 5710.33,8064.55 5710.33,7819.96 5737.78,7792.52 6091.61,7792.52 6111.23,7812.13 6111.23,7839.97 6099.06,7852.14 6076.63,7852.14 6062.71,7866.06 6062.71,7911.04 6048.79,7924.96 6037.26,7924.96 6023.34,7911.04 6023.34,7866.06 6009.42,7852.14 U20.1
VBUS: C1.2 F1.1 U18.1 U18.3 USB1.A4B9 USB1.B4A9 VBUS.1 | length 6945.4
  Top Layer w10: v1(5184.72,4851.34) 5184.72,4461.34 5353.46,4292.6 5353.46,3502.6 ; C1.2 5353.46,3502.6 ; v1(5622.05,8005.08) 5602.05,8025.08 USB1.B4A9 5602.05,8066.95 5632.05,8096.95 5632.05,8126.95 5652.05,8146.95 5741.03,8146.95 ; U18.1 5736.66,3508.06 5736.66,3518.06 5716.66,3538.06 5691.45,3538.06 5666.66,3513.27 U18.3 5665.99,3502.6 5353.46,3502.6 ; v1(5767.18,8193.1) 5741.03,8166.95 5741.03,8146.95 ; USB1.A4B9 5791.03,8066.95 5781.03,8076.95 5781.03,8106.95 5741.03,8146.95 ; v1(6254.77,8193.37) F1.1
  Bottom Layer w10: v1(5184.72,4851.34) 5130.71,4905.35 5130.71,7773.74 VBUS.1 5444.72,7827.76 v1(5622.05,8005.08)
  Bottom Layer w19.68: v1(5767.18,8193.1) 5767.18,8191.84 5799.06,8159.96 6221.35,8159.96 v1(6254.77,8193.37)
VCC: C2.2 I2C.1 R1.2 R2.2 R3.2 SW2.6 U17.6 U18.5 VCC.1 | length 11558.1
  Top Layer w10: v1(5711.46,3386.65) U18.5 6158.26,3416.65 C2.2 6574.21,3462.6 7993.63,4882.02 7993.63,5522.02 8033.63,5562.02 R2.2 8083.63,5978.89 8083.63,6675.22 R3.2 R1.2 ; v1(5734.04,5279.22) v1(5734.04,5439.22)
  Bottom Layer w10: I2C.1 3242.99,5755.12 3242.99,4822.56 SW2.6 3398.9,4666.65 5691.46,4666.65 5731.46,4706.65 ; VCC.1 5374.72,3386.65 v1(5711.46,3386.65) 5711.46,4636.65 5731.46,4656.65 5731.46,4706.65 ; v1(5734.04,5279.22) 5731.46,5276.65 5731.46,4706.65 ; v1(5734.04,5439.22) U17.6
pads on no net: U1. U2. U3. U4. U5. U6. U7. U8. U9. U10. U11. U12. U13. U14. U15. U16. U18.4 USB1.A5 USB1.A8 USB1.B5 USB1.B8

## Polygon pours and split planes (outlines as drawn)
GND on Bottom Layer (solid, remove dead copper, pour order 2): 3506.57,8314.96 7876.65,8314.96 cw(c7876.65,7842.52) 8349.09,7842.52 8349.09,3472.44 cw(c7876.65,3472.44) 7876.65,3000 3506.57,3000 cw(c3506.57,3472.44) 3034.13,3472.44 3034.13,7842.52 cw(c3506.57,7842.52)
GND on Top Layer (solid, remove dead copper, pour order 0): 3511.5,8314.96 7881.57,8314.96 cw(c7881.57,7842.52) 8354.02,7842.52 8354.02,3472.44 cw(c7881.57,3472.44) 7881.57,3000 3511.5,3000 cw(c3511.5,3472.44) 3039.05,3472.44 3039.05,7842.52 cw(c3511.5,7842.52)

## Keep-outs
Board Outline Layer:
  lines w10: 3039.05,3472.44 ccw(c3511.5,3472.44) 3511.5,3000 7881.57,3000 ccw(c7881.57,3472.44) 8354.02,3472.44 8354.02,7842.52 ccw(c7881.57,7842.52) 7881.57,8314.96 3511.5,8314.96 ccw(c3511.5,7842.52) 3039.05,7842.52 3039.05,3472.44

## Text inside footprints (layer, text, board x,y; h text height)
SW2: Top Silkscreen Layer "NO" at 3588.39,4969.96 h31.5 r270; Top Silkscreen Layer "1" at 3418.39,4919.96 h31.5 r270; Top Silkscreen Layer "2" at 3418.39,4819.96 h31.5 r270; Top Silkscreen Layer "3" at 3418.39,4719.96 h31.5 r270